# Altium PCB PCB1.PcbDoc
Units mm, origin at the board's own origin, x right, y up, seen from the top; angles counter-clockwise.
Board outline 55.63 x 79.76 mm, 2 copper layers (Top Layer, Bottom Side); 9 components, 10 nets, 61 pads, 0 vias.
Unrouted connection lines stored in the file: 2.
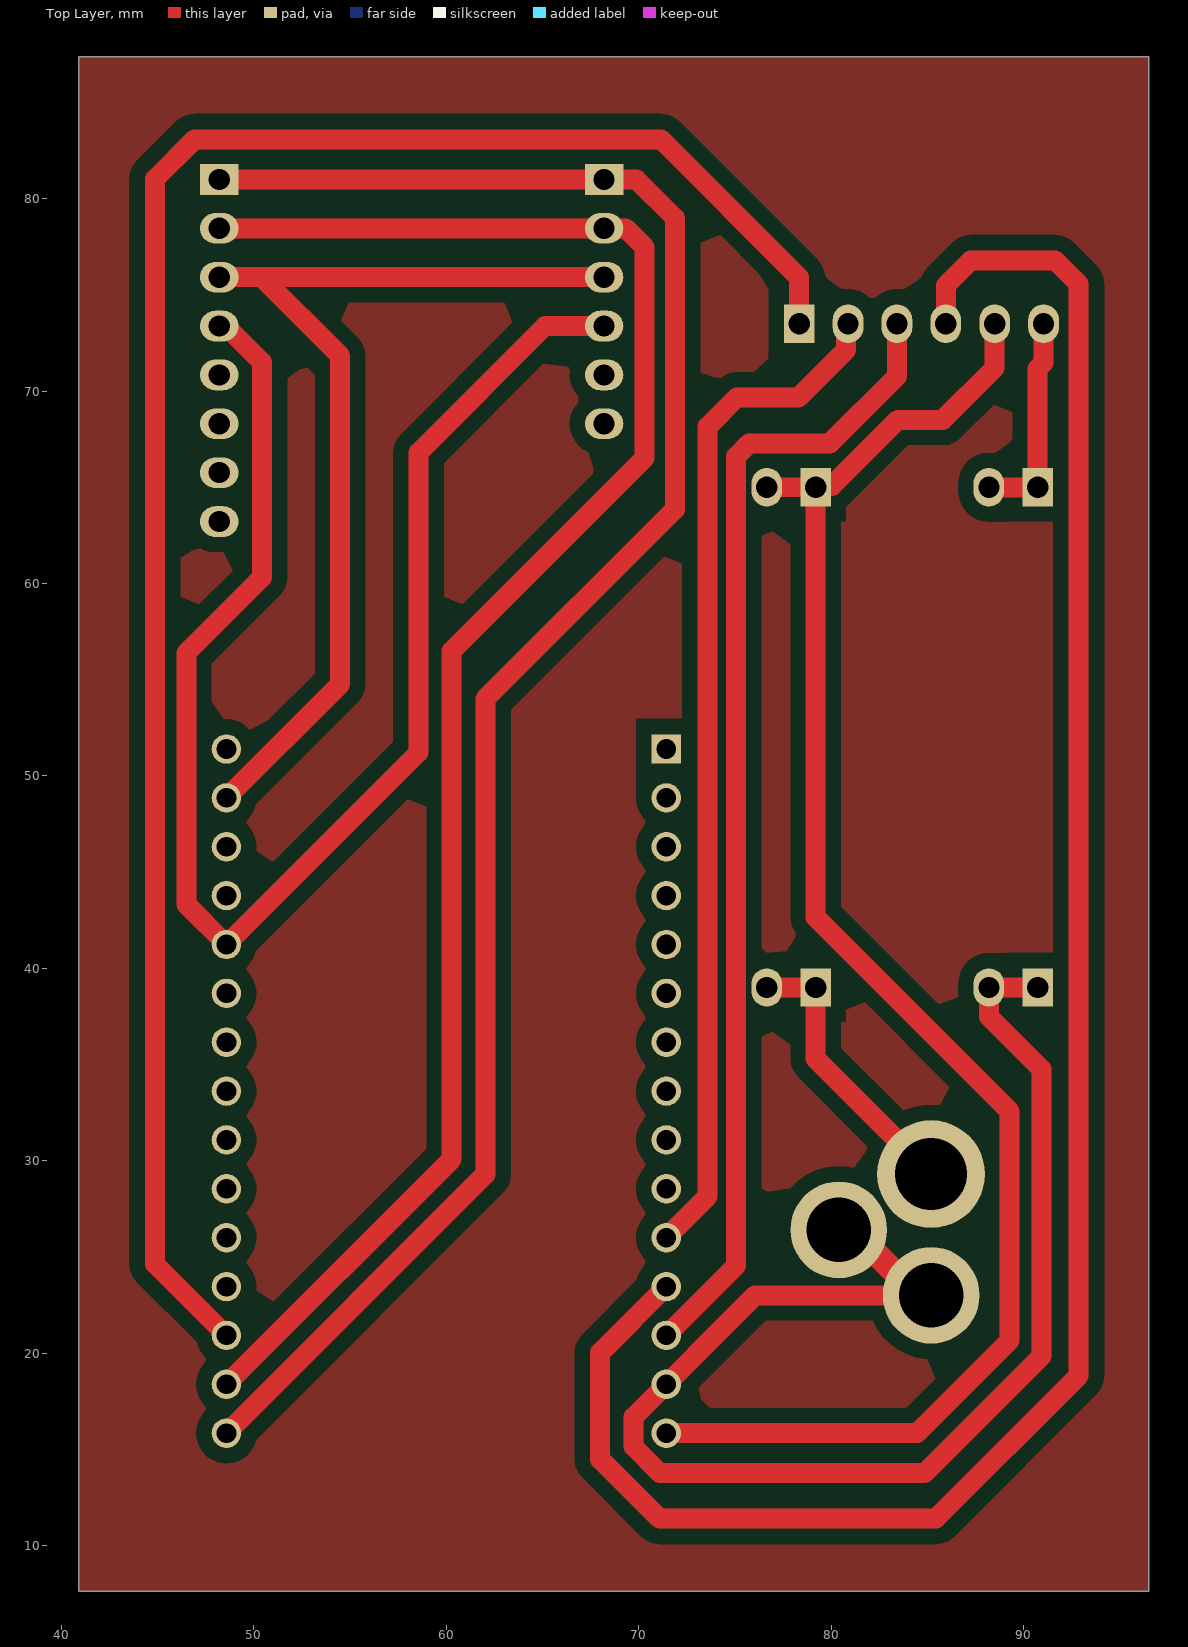
[diagram p0: Top Layer view]
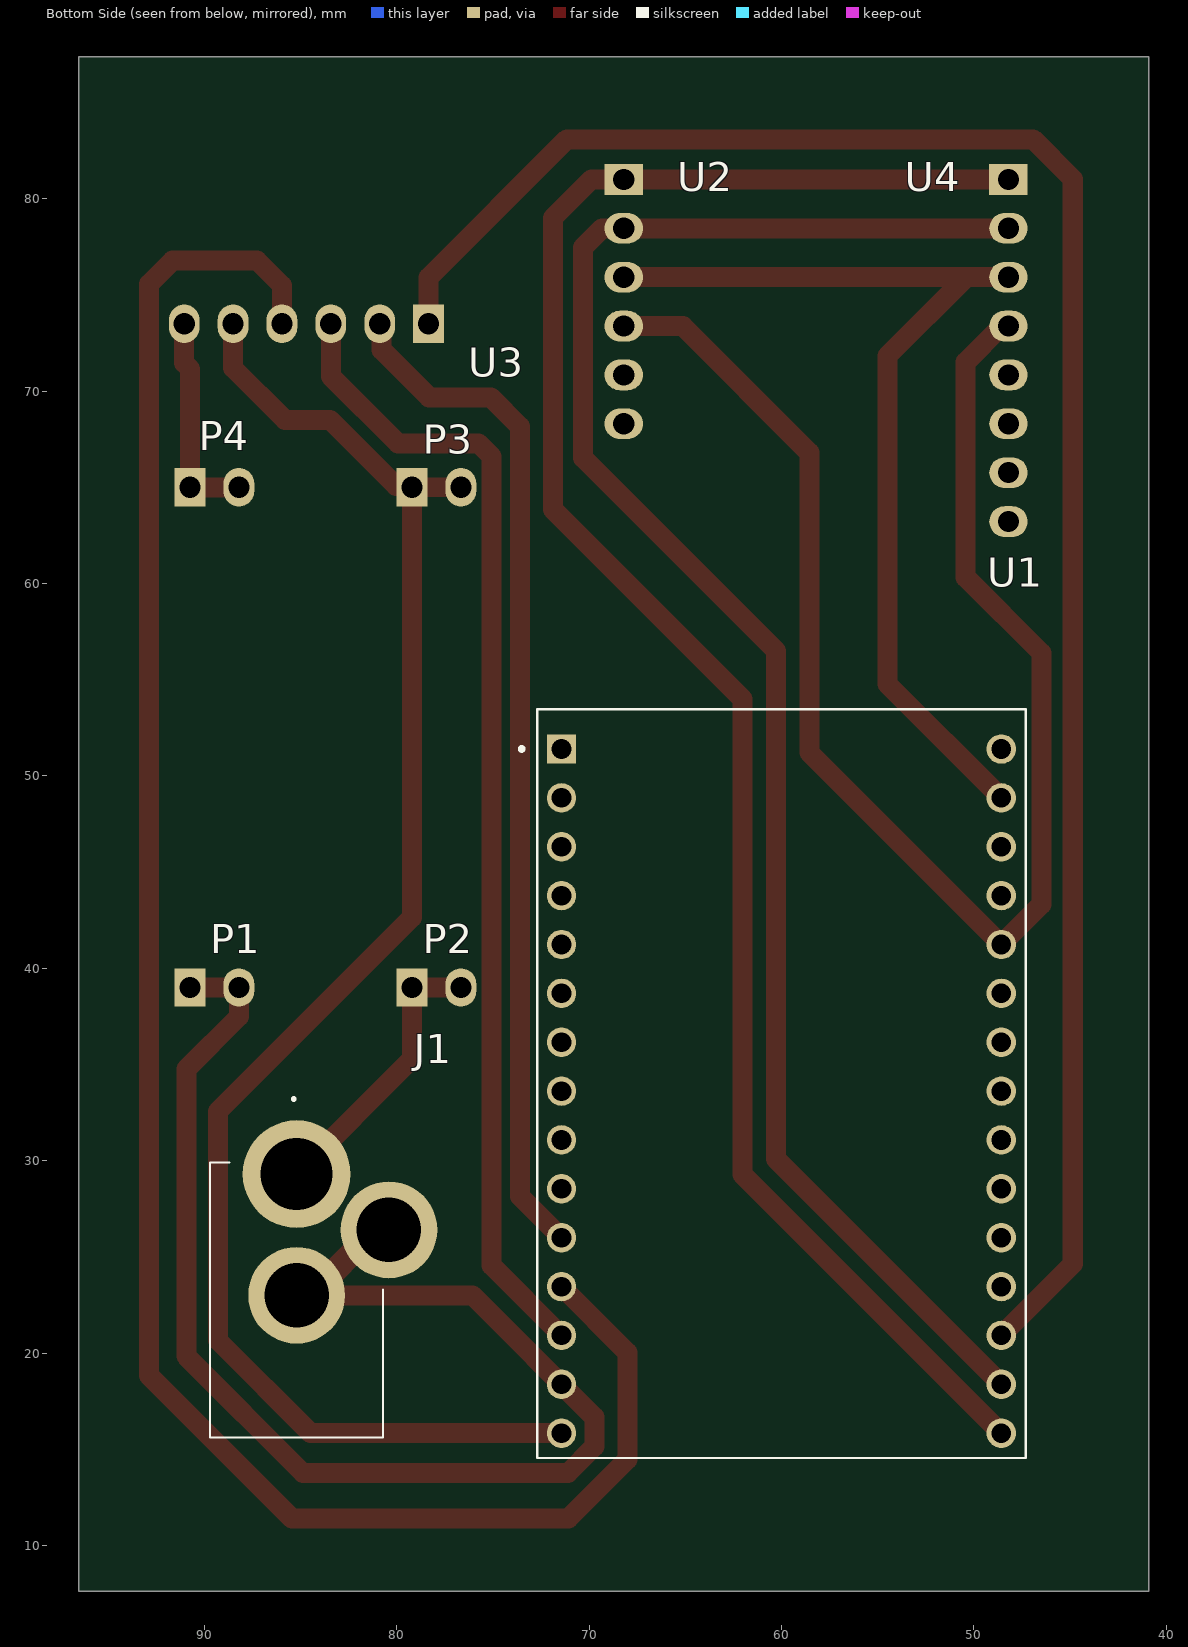
[diagram p1: Bottom Side view, seen from below]

## Layer stack, top to bottom
Top Solder: solder mask 0.0102, Solder Resist, Dk 3.5
Top Layer: signal copper 0.0356
Dielectric 1: dielectric 0.32, FR-4, Dk 4.8
Bottom Side: signal copper (thickness not stored)
Bottom Solder: solder mask 0.0102, Solder Resist, Dk 3.5

## Board outline
40.894,7.62 96.52,7.62 96.52,87.376 40.894,87.376

## Design rules (kind name [scope] priority, off if disabled: settings)
Clearance [All] p1: gap=0.254 ignorepadtopadclearanceinfootprint=TRUE
DiffPairsRouting [All] p1: maxlimit=0.254 minlimit=0.254 mostfreqgap=0.254 toplayer_minwidth=0.381 toplayer_maxwidth=0.381 toplayer_prefwidth=0.381 bottomlayer_minwidth=0.381 bottomlayer_maxwidth=0.381 bottomlayer_prefwidth=0.381 substack1={4A7D24C8-2904-49FA-99E6-01227A0BB5CE} toplayer_{4a7d24c8-2904-49fa-99e6-01227a0bb5ce}_minwidth=0.381 toplayer_{4a7d24c8-2904-49fa-99e6-01227a0bb5ce}_maxwidth=0.381 toplayer_{4a7d24c8-2904-49fa-99e6-01227a0bb5ce}_prefwidth=0.381 bottomlayer_{4a7d24c8-2904-49fa-99e6-01227a0bb5ce}_minwidth=0.381 bottomlayer_{4a7d24c8-2904-49fa-99e6-01227a0bb5ce}_maxwidth=0.381 bottomlayer_{4a7d24c8-2904-49fa-99e6-01227a0bb5ce}_prefwidth=0.381 maxuncoupledlength=12.7
Height [All] p1: minheight=0 maxheight=50 prefheight=12.7
PolygonConnect [All] p1: connectstyle=Relief reliefconductorwidth=0.254 reliefentries=4 polygonreliefangle="90 Angle" airgapwidth=0.254
RoutingLayers [All] p1: top layer_v5=TRUE bottom layer_v5=FALSE
RoutingVias [All] p1: holewidth=0.711 width=1.27 viastyle="Through Hole" minholewidth=0.711 minwidth=1.27 maxholewidth=0.711 maxwidth=1.27
SolderMaskExpansion [All] p1: expansion=0 istentingtop=FALSE
SupplyNets "Schematic Supply Nets" [InNet('GND')] p1: voltage=0.000
Width [All] p1: maxlimit=1.143 minlimit=1.016 preferedwidth=1.041 substack1={4A7D24C8-2904-49FA-99E6-01227A0BB5CE} toplayer_{4a7d24c8-2904-49fa-99e6-01227a0bb5ce}_minwidth=0.254 toplayer_{4a7d24c8-2904-49fa-99e6-01227a0bb5ce}_maxwidth=1.27 toplayer_{4a7d24c8-2904-49fa-99e6-01227a0bb5ce}_prefwidth=1.016 bottomlayer_{4a7d24c8-2904-49fa-99e6-01227a0bb5ce}_minwidth=0.254 bottomlayer_{4a7d24c8-2904-49fa-99e6-01227a0bb5ce}_maxwidth=1.27 bottomlayer_{4a7d24c8-2904-49fa-99e6-01227a0bb5ce}_prefwidth=1.016
27 further rules are at their usual default settings.

## Classes and differential pairs
component class Altium_PCB_SD: J1 P1 P2 P4 U1 U2 U3 U4

## Components (designator, comment, footprint, x,y, rotation, side; value= is the part's Value field where it differs from the comment)
J1 "DCJ200-10-A-K1-K" DCJ20010AK1K 85.197,29.3 r180 bottom
P1 "2PIN" 2PIN 18.22,52.462 r90 bottom
P2 "2PIN" 2PIN 6.68,52.462 r90 bottom
P3 "2PIN" 2PIN 6.68,78.462 r90 bottom
P4 "2PIN" 2PIN 18.22,78.462 r90 bottom
U1 "ESP32-C3-DEVKITM-1" XCVR_ESP32-C3-DEVKITM-1 60,34 r180 bottom
U2 "BMP260" BMP260 67.197,72.3 r180 bottom
U3 "microSD" microSD 91.04,73.5 r270 bottom
U4 "MPU6050" MPU6050 72.327,78.079 r180 bottom

## Footprints (in the part's own frame and the unit in brackets; to place one, negate y for a bottom-side part, rotate by r counter-clockwise, add the part's x,y. Pads: shape width x height; smd on the part's side, far side on the other; paste and mask are expansions set on the pad)
2PIN [mm]
  rect 2x1.6 hole 1.1: 1(-13.462,72.517)
  oval 2x1.6 hole 1.1: 2(-13.462,69.977)
BMP260 [mm]
  rect 2x1.6 hole 1.1: 1(-1,8.7)
  oval 2x1.6 hole 1.1: 2(-1,6.16) 3(-1,3.62) 4(-1,1.08) 5(-1,-1.46) 6(-1,-4)
DCJ20010AK1K [mm]
  round 5.604 hole 3.736 mask+0.102: 1(0,0)
  round 5.028 hole 3.352 mask+0.102: 2(0,-6.3) 3(4.8,-2.9)
  silkscreen extent -4.5,-13.7 4.5,3.95, body extent -4.5,-13.45 5.05,0.85, height 11
microSD [mm]
  rect 2x1.6 hole 1.1: 1(0,12.7)
  oval 2x1.6 hole 1.1: 2(0,10.16) 3(0,7.62) 4(0,5.08) 5(0,2.54) 6(0,0)
  body extent -6.3,-5.37 0.4,18.63, height 46.9
MPU6050 [mm]
  rect 2x1.6 hole 1.1: 1(24.13,2.921)
  oval 2x1.6 hole 1.1: 2(24.13,0.381) 3(24.13,-2.159) 4(24.13,-4.699) 5(24.13,-7.239) 6(24.13,-9.779) 7(24.13,-12.319) 8(24.13,-14.859)
XCVR_ESP32-C3-DEVKITM-1 [mm]
  rect 1.53x1.53 / inner round 1.53 / far side rect 1.53x1.53 hole 1.02: 1(-11.43,17.395)
  round 1.53 hole 1.02: 2(-11.43,14.855) 3(-11.43,12.315) 4(-11.43,9.775) 5(-11.43,7.235) 6(-11.43,4.695) 7(-11.43,2.155) 8(-11.43,-0.385) 9(-11.43,-2.925) 10(-11.43,-5.465) 11(-11.43,-8.005) 12(-11.43,-10.545) 13(-11.43,-13.085) 14(-11.43,-15.625) 15(-11.43,-18.165) 16(11.43,-18.165) 17(11.43,-15.625) 18(11.43,-13.085) 19(11.43,-10.545) 20(11.43,-8.005) 21(11.43,-5.465) 22(11.43,-2.925) 23(11.43,-0.385) 24(11.43,2.155) 25(11.43,4.695) 26(11.43,7.235) 27(11.43,9.775) 28(11.43,12.315) 29(11.43,14.855) 30(11.43,17.395)
  silkscreen extent -13.6,-19.45 12.7,19.45, body extent -12.7,-19.95 12.7,24.77, height 7.14

## Part data
J1: "Power Barrel Connector Jack 2.05mm ID (0.081), 5.50mm OD (0.217) Through Hole, Right Angle", Package=None, Check_prices=https://www.snapeda.com/parts/DCJ200-10-A-K1-K/Global+Connector+Technology/view-part/?ref=eda, MF="Global Connector Technology", MP=DCJ200-10-A-K1-K, SnapEDA_Link=https://www.snapeda.com/parts/DCJ200-10-A-K1-K/Global+Connector+Technology/view-part/?ref=snap
U1: "WiFi Development Tools (802.11) (ENGINEERING SAMPLE ONLY) ESP32-C3 General-Purpose Dev Board, Embeds ESP32-C3-MINI-1, 4 MB Flash, w/ Pin Header", Package=None, Check_prices=https://www.snapeda.com/parts/ESP32-C3-DEVKITM-1/Espressif+Systems/view-part/?ref=eda, MF="Espressif Systems", MP=ESP32-C3-DEVKITM-1, SnapEDA_Link=https://www.snapeda.com/parts/ESP32-C3-DEVKITM-1/Espressif+Systems/view-part/?ref=snap

## Nets (pads, with @x,y where several pads share a name; then routed paths per layer and width w, separated by ;. In a path a pad name is that pad's centre, name@x,y a point inside that pad or via, vN(x,y) a via of type N, cw(c..) or ccw(c..) an arc to the next point about the centre after c; other vN are vias at no path point)
GND: J1.2 J1.3 P1.1 P1.2 P4.1 P4.2 U1.14 U1.17 U2.2 U3.6 U4.2 | length 174
  Top Layer w1.041: U4.2 U2.2 69.317,78.46 70.307,77.47 70.307,66.523 60.274,56.49 60.274,30.079 U1.17 ; J1.2 84.497,23 76.055,23 69.723,16.668 69.723,15.139 71.095,13.767 84.861,13.767 90.932,19.837 90.932,34.755 88.197,37.49 P1.2 P1.1 ; P4.2 P4.1 90.737,71.157 91.04,71.46 U3.6
  Top Layer w1.27: J1.3 81.097,26.4 J1.2@84.497,23
NetJ1_1: J1.1 P2.1 P2.2 | length 14.7
  Top Layer w1.041: P2.2 P2.1 79.197,35.3 J1.1
NetP3_1: P3.1 P3.2 U1.15 U3.5 | length 85.1
  Top Layer w1.016: P3.2 P3.1
  Top Layer w1.041: U1.15 84.466,15.835 89.281,20.65 89.281,32.563 79.197,42.647 P3.1 79.272,65.075 80.035,65.075 83.464,68.504 85.801,68.504 88.5,71.203 U3.5
NetU1_11: U1.11 U3.2 | length 53.3
  Top Layer w1.041: U1.11 73.584,28.149 73.584,68.148 75.108,69.672 78.308,69.672 80.779,72.143 80.779,73.399 U3.2
NetU1_12: U1.12 U3.4 | length 106.3
  Top Layer w1.041: U1.12 67.996,20.021 67.996,14.478 71.069,11.405 85.446,11.405 92.862,18.821 92.862,75.565 91.643,76.784 87.256,76.784 85.96,75.488 U3.4
NetU1_13: U1.13 U3.3 | length 60
  Top Layer w1.041: U1.13 75.062,24.547 75.062,66.603 75.74,67.282 79.931,67.282 83.42,70.771 U3.3
NetU1_16: U1.16 U2.1 U4.1 | length 97.3
  Top Layer w1.041: U4.1 U2.1 69.876,81 71.882,78.994 71.882,63.856 62.027,54 62.027,29.292 U1.16
NetU1_18: U1.18 U3.1 | length 101.4
  Top Layer w1.041: U1.18 44.856,24.629 44.856,81.025 46.914,83.083 71.155,83.083 78.34,75.898 U3.1
NetU1_26: U1.26 U2.4 U4.4 | length 77.8
  Top Layer w1.041: U4.4 48.54,73.38 50.419,71.501 50.419,60.321 46.482,56.384 46.482,43.323 U1.26 58.547,51.212 58.547,66.801 65.126,73.38 U2.4
NetU1_29: U1.29 U2.3 U4.3 | length 51.2
  Top Layer w1.041: U4.3 50.394,75.92 ; U1.29 54.483,54.768 54.483,71.831 50.394,75.92 ; U2.3 50.394,75.92
pads on no net: U1.1 U1.2 U1.3 U1.4 U1.5 U1.6 U1.7 U1.8 U1.9 U1.10 U1.19 U1.20 U1.21 U1.22 U1.23 U1.24 U1.25 U1.27 U1.28 U1.30 U2.5 U2.6 U4.5 U4.6 U4.7 U4.8

## Polygon pours and split planes (outlines as drawn)
no net on Top Layer "NONET_L01_P000" (solid, pour order 0): 40.894,87.376 40.894,7.493 41.021,7.62 96.52,7.62 96.52,87.376